# Altium PCB PCB1.PcbDoc (part 1 of 2)
Units mm, origin at the board's own origin, x right, y up, seen from the top; angles counter-clockwise.
Board outline 42.2 x 61.7 mm, 4 copper layers (Top Layer, Mid Layer 1, Mid Layer 2, Bottom Layer), stack 1.586 mm thick; 117 components, 70 nets, 392 pads, 1231 vias.
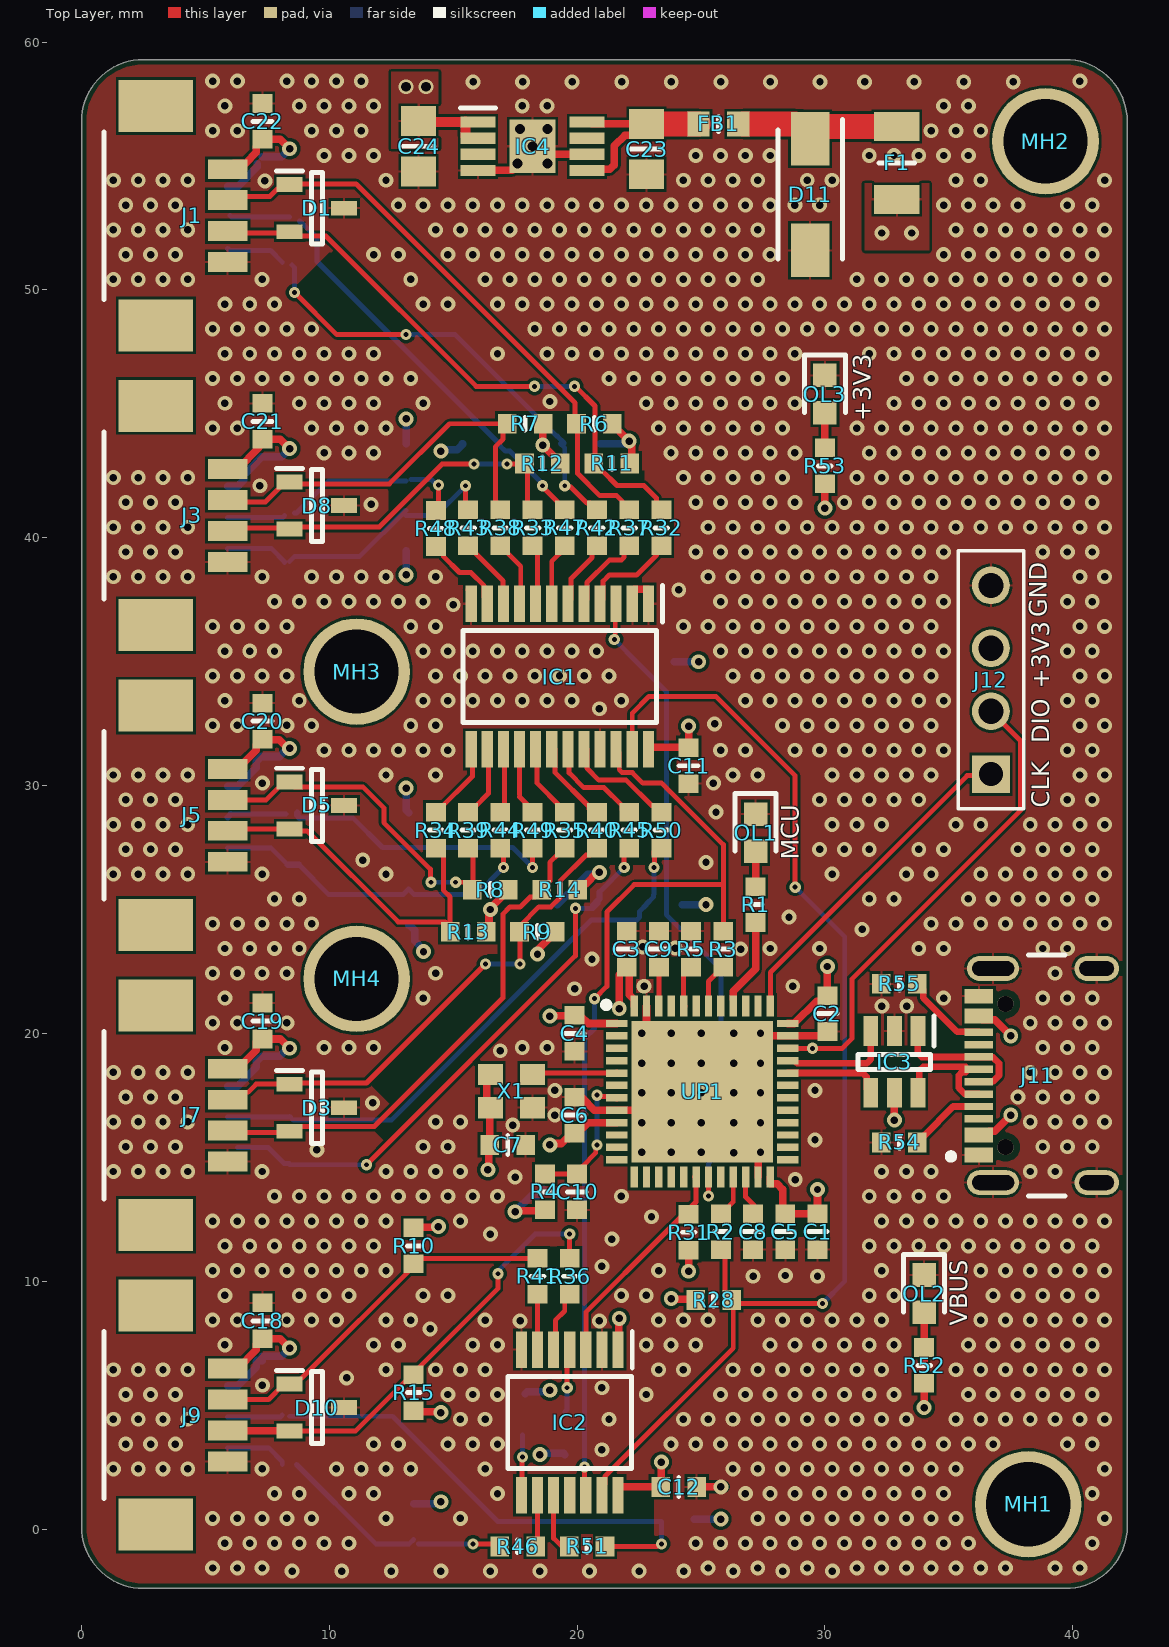
[diagram p0: Top Layer view]
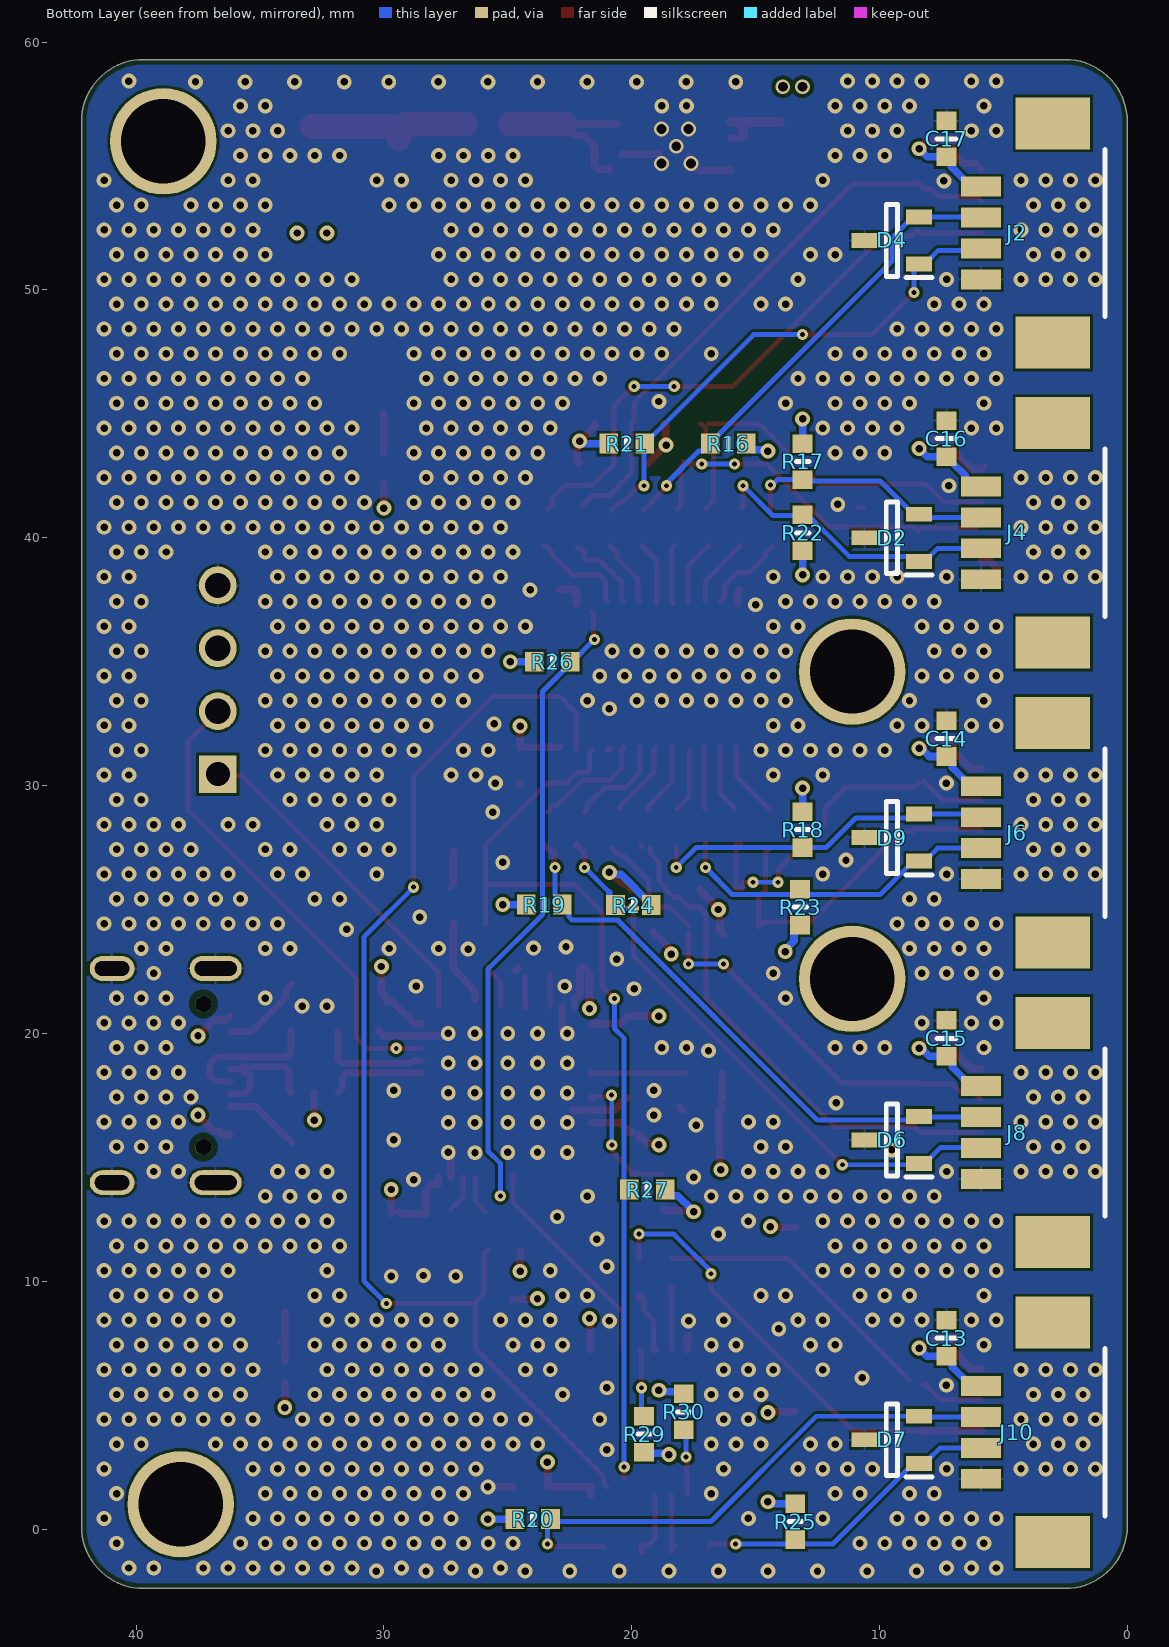
[diagram p1: Bottom Layer view, seen from below]
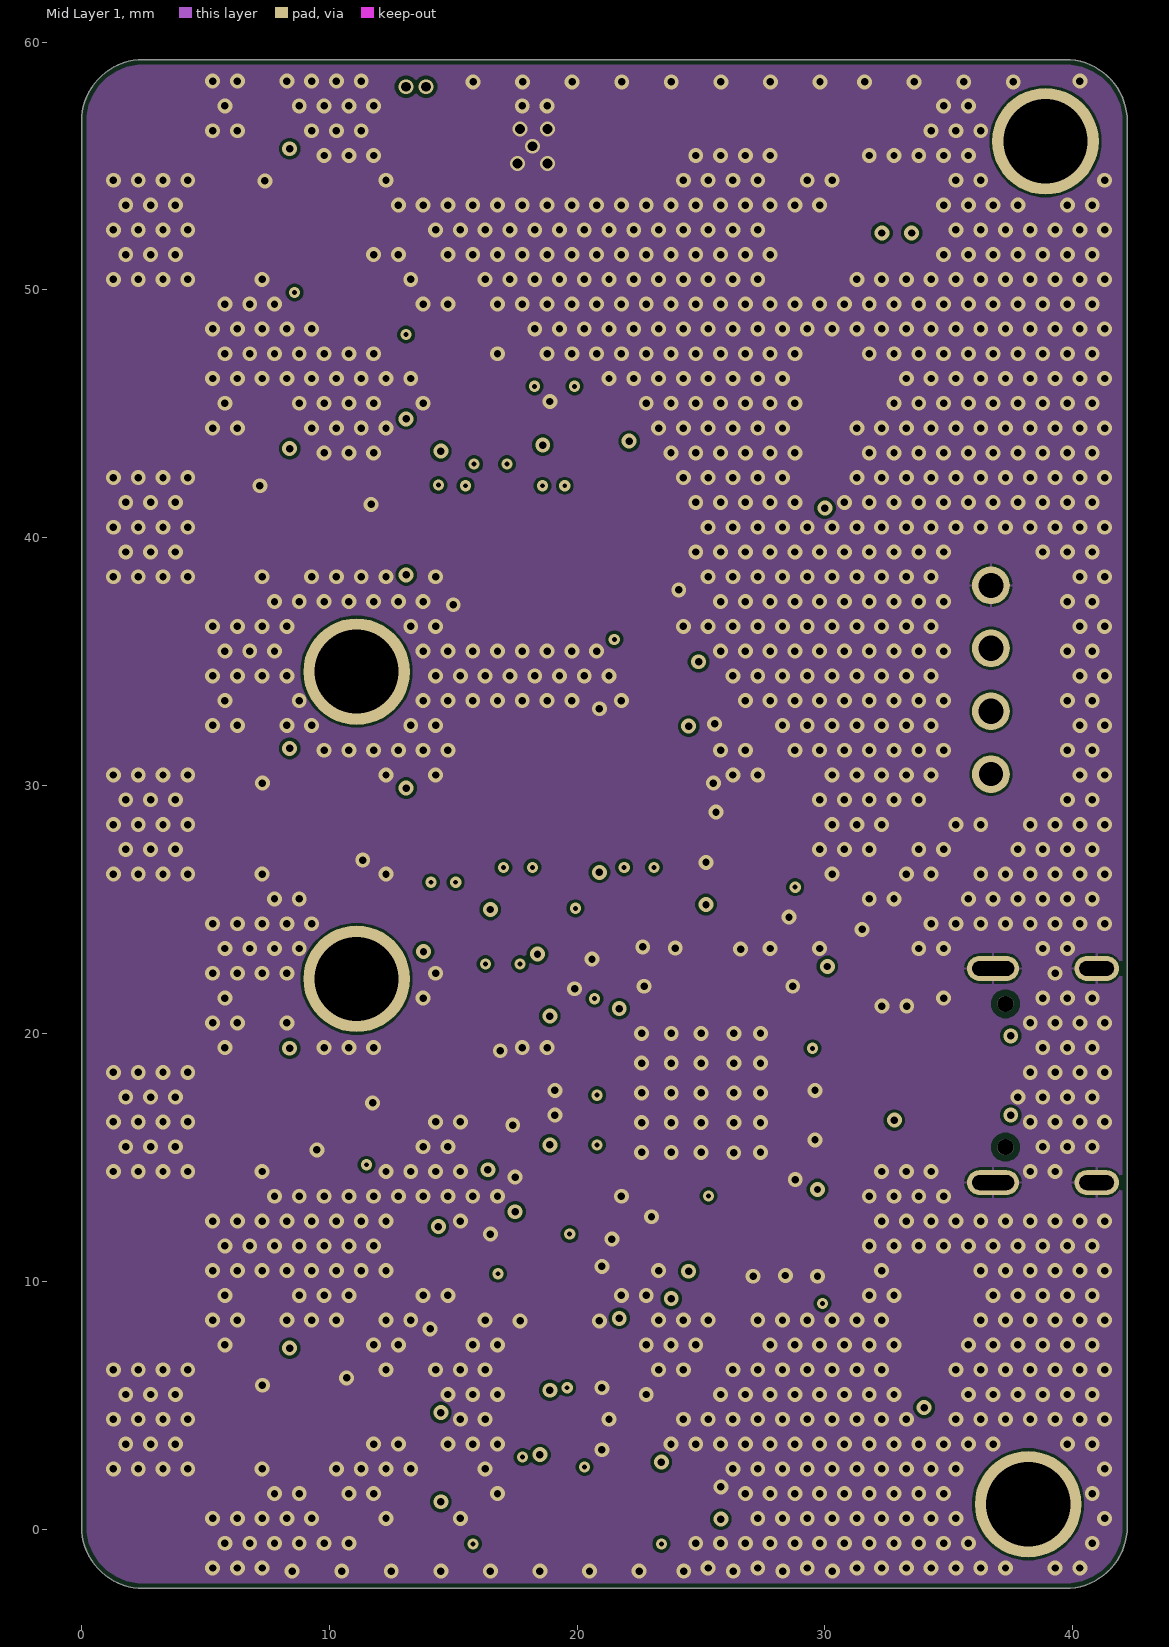
[diagram p2: Mid Layer 1]
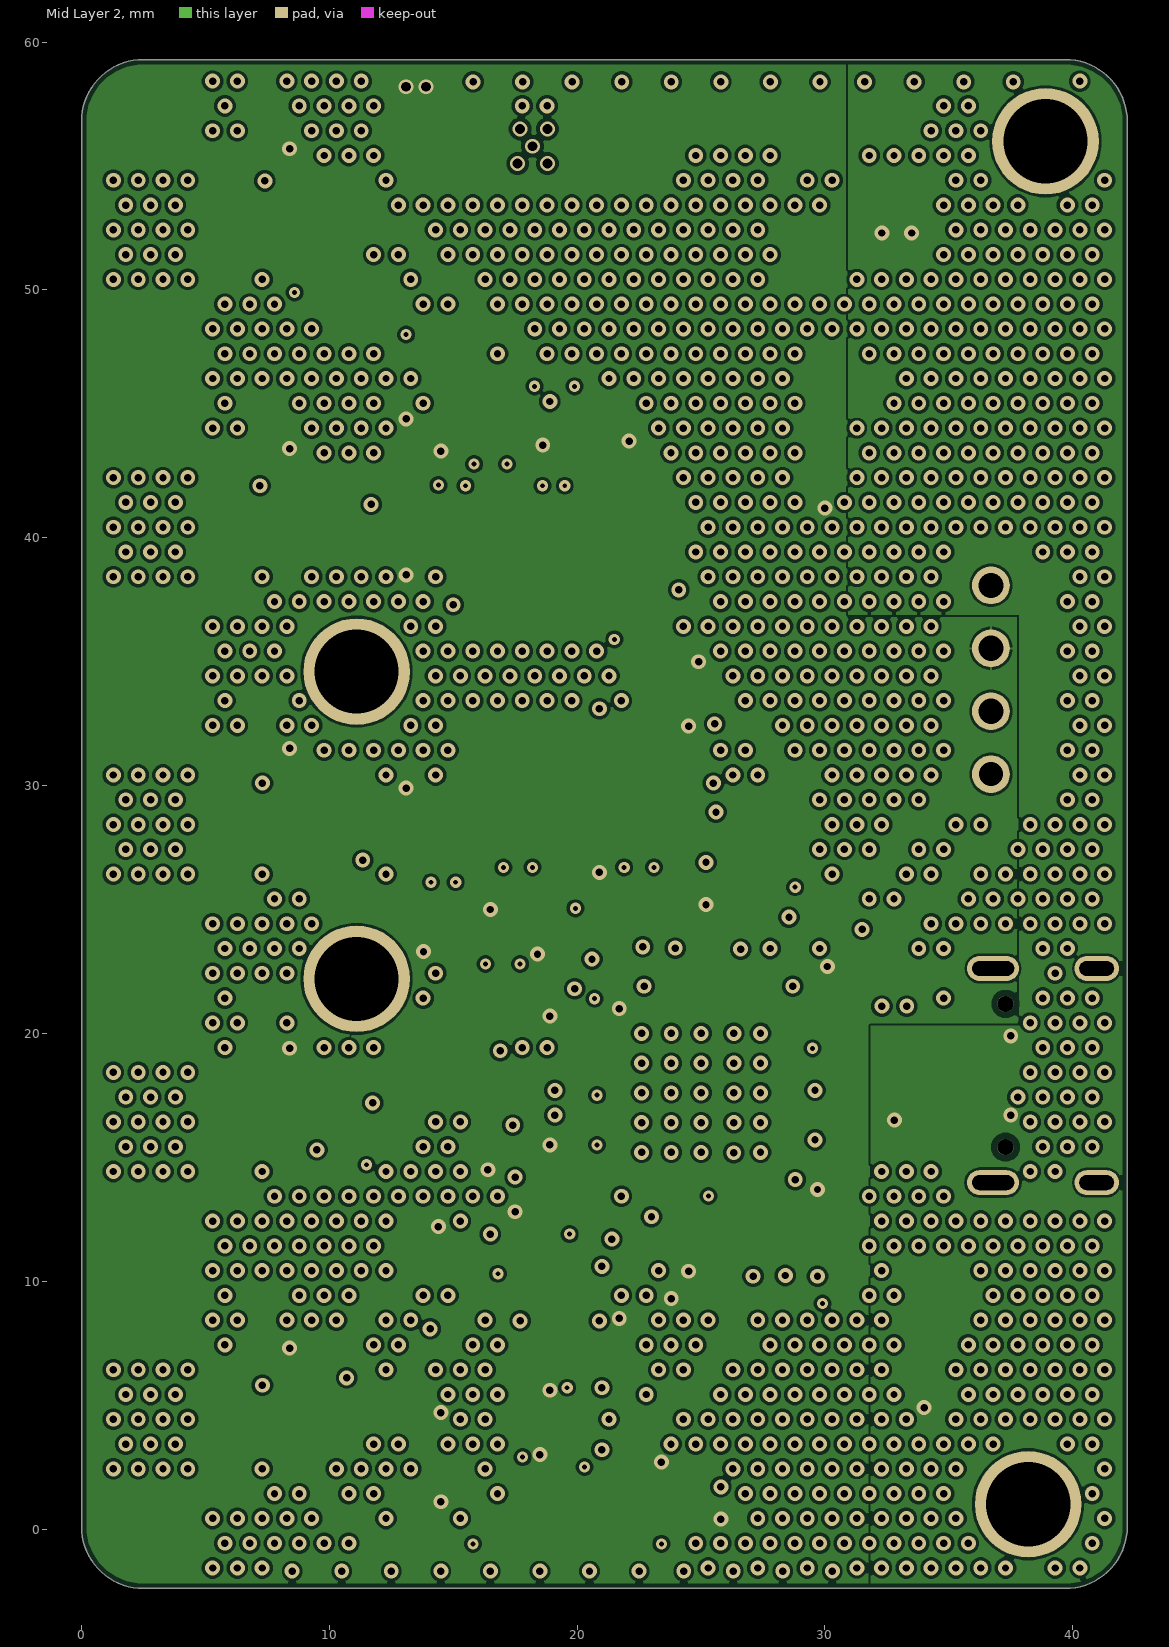
[diagram p3: Mid Layer 2]
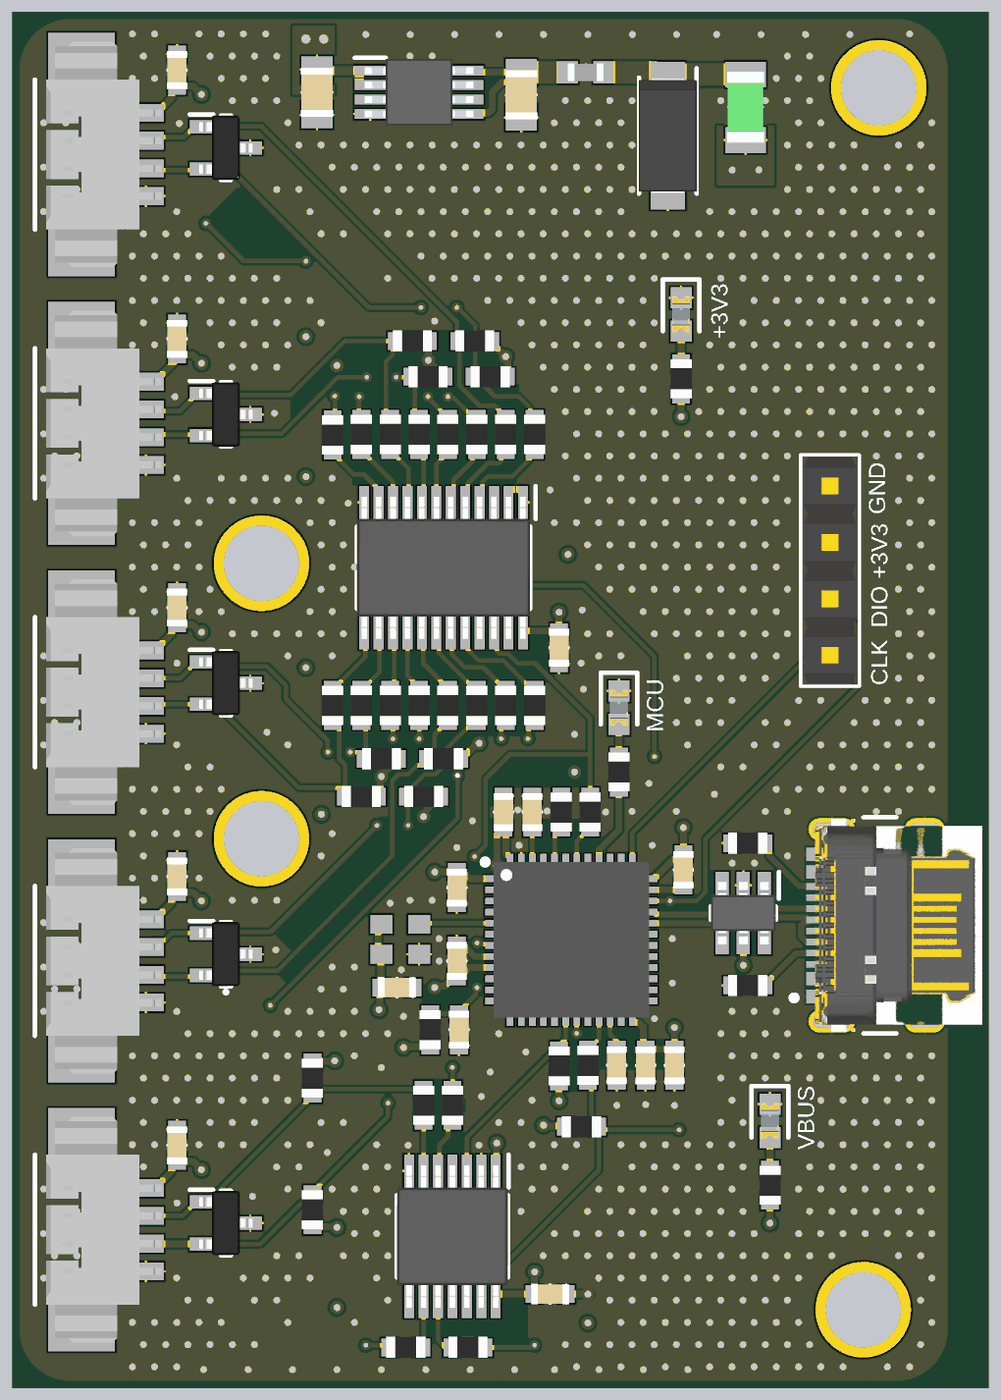
[diagram p5: 3D render of the assembled board from above, using the file's embedded part models]
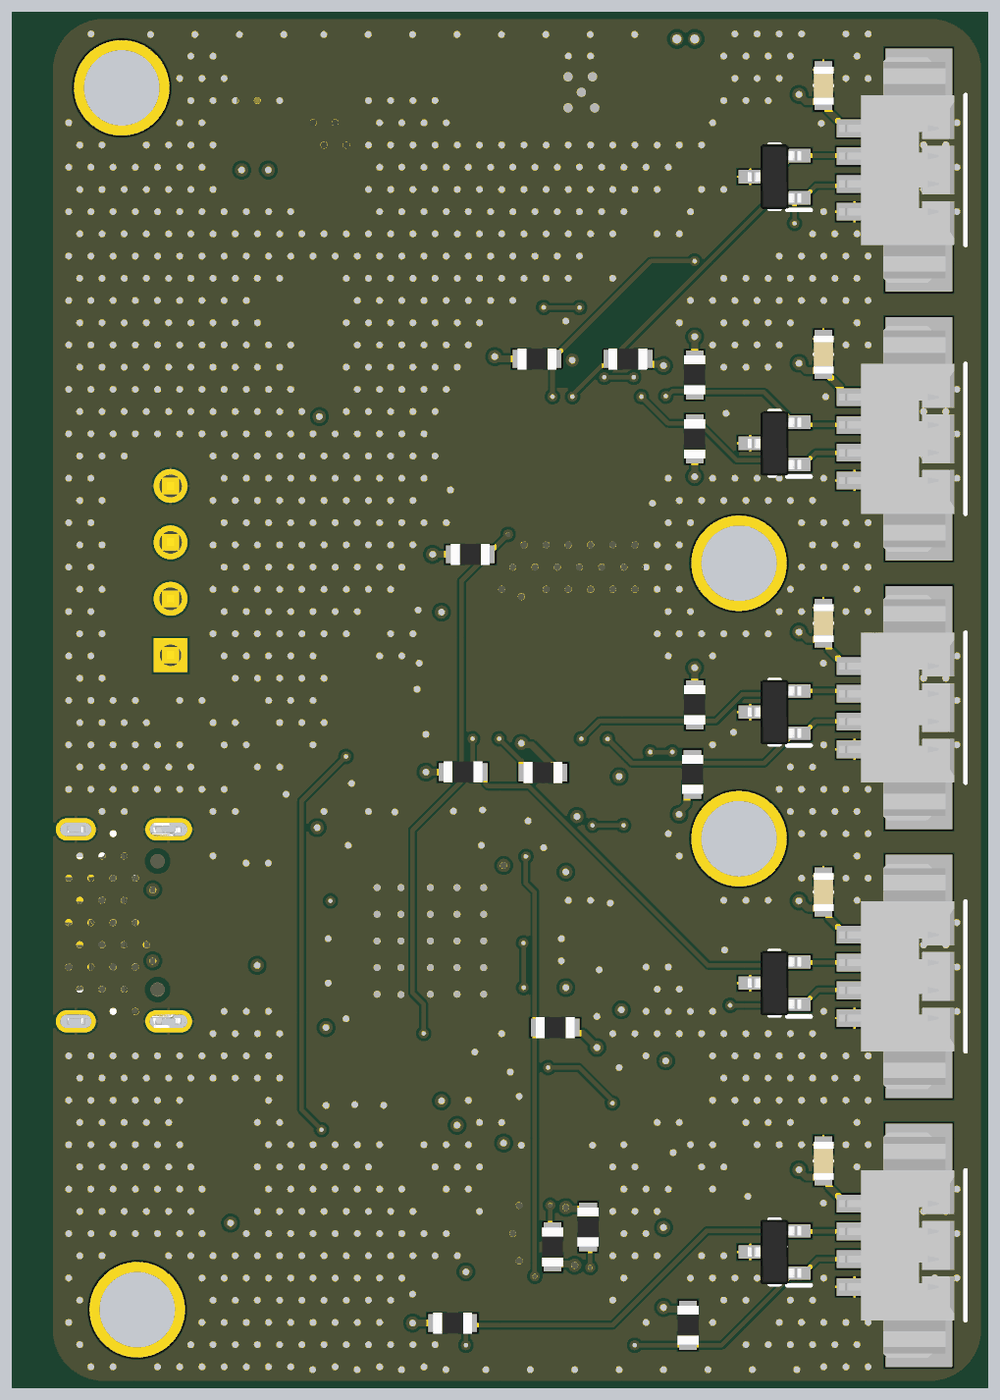
[diagram p6: 3D render of the assembled board from below, using the file's embedded part models]

## Layer stack, top to bottom
Top Solder: solder mask 0.0254, SM-001, Dk 4
Top Layer: signal copper 0.035
Dielectric 1: prepreg 0.2104, PP-017, Dk 4.4
Mid Layer 1: signal copper 0.0152
Dielectric 3: core 1.065, Core-039, Dk 4.6
Mid Layer 2: signal copper 0.0152
Dielectric 5: prepreg 0.2104, PP-017, Dk 4.4
Bottom Layer: signal copper 0.035
Bottom Solder: solder mask 0.0254, SM-001, Dk 4

## Board outline
0,0.1 0,56.8 cw(c2.5,56.8) 2.5,59.3 39.7,59.3 cw(c39.7,56.8) 42.2,56.8 42.2,0.1 cw(c39.7,0.1) 39.7,-2.4 2.5,-2.4 cw(c2.5,0.1)

## Design rules (kind name [scope] priority, off if disabled: settings)
BoardOutlineClearance [All] p1: gap=0.2 ignorepadtopadclearanceinfootprint=FALSE
Clearance [All] p1: gap=0.102 ignorepadtopadclearanceinfootprint=FALSE except(0.127: Arc-Via Track-Via SMDPad-Via THPad-Via Via-Via Via-Fill Via-Poly Via-Region Via-Text; 0.25: Arc-Hole Track-Hole SMDPad-Hole THPad-Hole Via-Hole Fill-Hole Poly-Hole Region-Hole Text-Hole)
ComponentClearance [All] p1: gap=0.102 collisioncheckmode=3 verticalgap=0.102 showdistances=TRUE
DiffPairsRouting [All] p1: maxlimit=0.2 minlimit=0.102 mostfreqgap=0.127 toplayer_minwidth=0.102 toplayer_maxwidth=1816.048 toplayer_prefwidth=0.269 bottomlayer_minwidth=0.102 bottomlayer_maxwidth=1816.048 bottomlayer_prefwidth=0.269 impedanceprofiledriven=TRUE impedanceprofileid={21170277-CD77-4ECB-8BFB-6CDE4E23F43F} impedanceprofilevalue=90.000000 maxuncoupledlength=12.7
Height [All] p1: minheight=0 maxheight=1816.048 prefheight=12.7
HoleSize [All] p1: absolutevalues=TRUE maxlimit=6.3 minlimit=0.2 maxpercent=80.000 minpercent=20.000
HoleToHoleClearance [All] p1: gap=0.25 allowstackedmicrovias=FALSE
MinimumAnnularRing [All] p1: minimumring=0.076
MinimumSolderMaskSliver [All] p1: minsoldermaskwidth=0
PlaneClearance [All] p1: clearance=0.102
PlaneConnect PlaneConnectPowerPads [InPadClass('PowerPads')] p1: planeconnectstyle=Direct reliefexpansion=0.508 reliefentries=4 reliefconductorwidth=0.254 reliefairgap=0.254
PlaneConnect [All] p2: pad.planeconnectstyle=Relief pad.reliefexpansion=0.3 pad.reliefentries=4 pad.reliefconductorwidth=0.102 pad.reliefairgap=0.102 via.planeconnectstyle=Direct via.reliefexpansion=0.3 via.reliefentries=4 via.reliefconductorwidth=0.127 via.reliefairgap=0.127
PolygonConnect PolygonConnectPowerPads [All vs (InPadClass('PowerPads'))] p1: connectstyle=Direct reliefconductorwidth=0.254 reliefentries=4 polygonreliefangle="90 Angle" airgapwidth=0.254
PolygonConnect [All] p2: thpad.connectstyle=Relief thpad.reliefconductorwidth=0.102 thpad.reliefentries=4 thpad.polygonreliefangle="90 Angle" thpad.airgapwidth=0.102 smdpad.connectstyle=Relief smdpad.reliefconductorwidth=0.102 smdpad.reliefentries=4 smdpad.polygonreliefangle="90 Angle" smdpad.airgapwidth=0.102 via.connectstyle=Direct via.reliefconductorwidth=0.127 via.reliefentries=4 via.polygonreliefangle="90 Angle" via.airgapwidth=0.127
RoutingVias [All] p1: holewidth=0.2 width=0.45 viastyle="Through Hole" minholewidth=0.2 minwidth=0.45 maxholewidth=6.3 maxwidth=6.55
SilkToSilkClearance [All] p1: silktosilkclearance=0
SilkToSolderMaskClearance [IsPad] p1: minsilkscreentomaskgap=0.102 clearancetoexposedcopper=TRUE
SolderMaskExpansion [All] p1: expansion=0.075 istentingtop=FALSE
SupplyNets "Schematic Supply Nets_3" [InNet('+3V3')] p1: voltage=0.000
SupplyNets "Schematic Supply Nets_2" [InNet('+V_SAFE')] p2: voltage=0.000
SupplyNets "Schematic Supply Nets_1" [InNet('+VBUS')] p3: voltage=0.000
SupplyNets "Schematic Supply Nets" [InNet('GND')] p4: voltage=0.000
Width [All] p1: maxlimit=1816.048 minlimit=0.102 preferedwidth=0.102
20 further rules are at their usual default settings.

## Classes and differential pairs
component class Main: J12 MH1 MH2 MH3 MH4
component class Designator: C11 C12 D1 D2 D3 D4 D5 D6 D7 D8 D9 D10 IC1 IC2 R6 R7 R8 R9 R10 R11 R12 R13 R14 R15 R16 R17 R18 R19 R20 R21 R22 R23 R24 R25 R26 R27 R28 R29 R30 R31 R32 R33 R34 R35 R36 R37 R38 R39 R40 R41 R42 R43 R44 R45 R46 R47 R48 R49 R50 R51
differential pair USB: +USB_P -USB_N
differential pair MCU_USB: +MCU_USB_P -MCU_USB_N

## Components (designator, comment, footprint, x,y, rotation, side; value= is the part's Value field where it differs from the comment)
C1 "C_4.7u_25V_0603_5" 0603_Capacitor 29.7,12 r270 top value=4.7µF
C2 "C_100n_50V_0603_5" 0603_Capacitor 30.1,20.8 r270 top value=100nF
C3 "C_100n_50V_0603_5" 0603_Capacitor 22,23.4 r90 top value=100nF
C4 "C_100n_50V_0603_5" 0603_Capacitor 19.9,20 r270 top value=100nF
C5 "C_100n_50V_0603_5" 0603_Capacitor 28.4,12 r270 top value=100nF
C6 "C_100n_50V_0603_5" 0603_Capacitor 19.9,16.7 r90 top value=100nF
C7 "C_100n_50V_0603_5" 0603_Capacitor 17.2,15.5 r0 top value=100nF
C8 "C_2.2u_25V_0603_5" 0603_Capacitor 27.1,12 r270 top value=2.2µF
C9 "C_2.2u_25V_0603_5" 0603_Capacitor 23.3,23.4 r90 top value=2.2µF
C10 "C_100n_50V_0603_5" 0603_Capacitor 20,13.6 r270 top value=100nF
C11 "C_100n_50V_0603_5" 0603_Capacitor 24.5,30.8 r270 top value=100nF
C12 "C_100n_50V_0603_5" 0603_Capacitor 24.1,1.7 r0 top value=100nF
C13 "C_100n_50V_0603_5" 0603_Capacitor 7.3,7.7 r90 bottom value=100nF
C14 "C_100n_50V_0603_5" 0603_Capacitor 7.3,31.9 r90 bottom value=100nF
C15 "C_100n_50V_0603_5" 0603_Capacitor 7.3,19.8 r90 bottom value=100nF
C16 "C_100n_50V_0603_5" 0603_Capacitor 7.3,44 r90 bottom value=100nF
C17 "C_100n_50V_0603_5" 0603_Capacitor 7.3,56.1 r90 bottom value=100nF
C18 "C_100n_50V_0603_5" 0603_Capacitor 7.3,8.4 r90 top value=100nF
C19 "C_100n_50V_0603_5" 0603_Capacitor 7.3,20.5 r90 top value=100nF
C20 "C_100n_50V_0603_5" 0603_Capacitor 7.3,32.6 r90 top value=100nF
C21 "C_100n_50V_0603_5" 0603_Capacitor 7.3,44.7 r90 top value=100nF
C22 "C_100n_50V_0603_5" 0603_Capacitor 7.3,56.8 r90 top value=100nF
C23 "C_10u_50V_0805_10" 0805_Capacitor 22.8,55.684 r270 top value=10µF
C24 "C_10u_50V_0805_10" 0805_Capacitor 13.6,55.8 r270 top value=10µF
D1 "PESD5V0L2BT,215" SOT95P230X110-3N 9.5,53.3 r0 top
D2 "PESD5V0L2BT,215" SOT95P230X110-3N 9.5,40 r0 bottom
D3 "PESD5V0L2BT,215" SOT95P230X110-3N 9.5,17 r0 top
D4 "PESD5V0L2BT,215" SOT95P230X110-3N 9.5,52 r0 bottom
D5 "PESD5V0L2BT,215" SOT95P230X110-3N 9.5,29.2 r0 top
D6 "PESD5V0L2BT,215" SOT95P230X110-3N 9.5,15.7 r0 bottom
D7 "PESD5V0L2BT,215" SOT95P230X110-3N 9.5,3.6 r0 bottom
D8 "PESD5V0L2BT,215" SOT95P230X110-3N 9.5,41.3 r0 top
D9 "PESD5V0L2BT,215" SOT95P230X110-3N 9.5,27.9 r0 bottom
D10 "PESD5V0L2BT,215" SOT95P230X110-3N 9.5,4.9 r0 top
D11 "SMAJ5.0A" DIOM5226X243N 29.4,53.85 r270 top
F1 "1206L050_15YR" FUSC3216X75N 32.9,55.125 r90 top
FB1 "MPZ1608S601ATA00" BEADC1608X75N 25.7,56.7 r180 top
IC1 "TCA9548APW" SOP65P640X120-24N 19.3,34.4 r270 top
IC2 "TCA9543APW" SOP65P640X120-14N 19.7,4.3 r270 top
IC3 "USBLC6-2SC6" SOT95P280X145-6N 32.8,18.85 r270 top
IC4 "TLV76733DGNR" SOP65P490X110-9N 18.2,55.8 r0 top
J1 "53261-0471" 53261-0471 5.1,53 r270 top
J2 "53261-0471" 53261-0471 5.1,52.3 r90 bottom
J3 "53261-0471" 53261-0471 5.1,40.9 r270 top
J4 "53261-0471" 53261-0471 5.1,40.2 r90 bottom
J5 "53261-0471" 53261-0471 5.1,28.8 r270 top
J6 "53261-0471" 53261-0471 5.1,28.1 r90 bottom
J7 "53261-0471" 53261-0471 5.1,16.7 r270 top
J8 "53261-0471" 53261-0471 5.1,16 r90 bottom
J9 "53261-0471" 53261-0471 5.1,4.6 r270 top
J10 "53261-0471" 53261-0471 5.1,3.9 r90 bottom
J11 "USB4105-GF-A" USB_C 39.8,18.3 r90 top
J12 "77311-818-04LF" 77311-818-04LF_AMP 36.7,30.46 r270 top
MH1 "MH_M3" M3#1 38.2,1 r0 top
MH2 "MH_M3" M3#2 38,56 r0 top
MH3 "MH_M3" M3#1 11.1,34.6 r0 top
MH4 "MH_M3" M3#1 11.1,22.2 r0 top
OL1 "SML-LX0603SYW-TR" LEDC1608X60N 27.2,28.1 r270 top
OL2 "SML-LX0603SIW-TR" LEDC1608X60N 34,9.5 r270 top
OL3 "SML-LX0603GW-TR" LEDC1608X60N 30,45.8 r270 top
R1 "R_1k_0603_1" 0603_Resistor 27.2,25.2 r270 top
R2 "R_0_0603_5" 0603_Resistor 25.8,12 r90 top
R3 "R_0_0603_5" 0603_Resistor 25.9,23.4 r270 top
R4 "R_1k_0603_1" 0603_Resistor 18.7,13.6 r270 top
R5 "R_10k_0603_5" 0603_Resistor 24.6,23.4 r270 top
R6 "R_2.2k_0603_5" 0603_Resistor 20.7,44.6 r180 top
R7 "R_2.2k_0603_5" 0603_Resistor 17.9,44.6 r180 top
R8 "R_2.2k_0603_5" 0603_Resistor 16.5,25.8 r180 top
R9 "R_2.2k_0603_5" 0603_Resistor 18.4,24.1 r180 top
R10 "R_2.2k_0603_5" 0603_Resistor 13.4,11.425 r270 top
R11 "R_2.2k_0603_5" 0603_Resistor 21.4,43 r180 top
R12 "R_2.2k_0603_5" 0603_Resistor 18.6,43 r180 top
R13 "R_2.2k_0603_5" 0603_Resistor 15.6,24.1 r180 top
R14 "R_2.2k_0603_5" 0603_Resistor 19.3,25.8 r180 top
R15 "R_2.2k_0603_5" 0603_Resistor 13.4,5.5 r90 top
R16 "R_2.2k_0603_5" 0603_Resistor 16.1,43.8 r0 bottom
R17 "R_2.2k_0603_5" 0603_Resistor 13.1,43.075 r270 bottom
R18 "R_2.2k_0603_5" 0603_Resistor 13.1,28.225 r270 bottom
R19 "R_2.2k_0603_5" 0603_Resistor 23.525,25.2 r180 bottom
R20 "R_2.2k_0603_5" 0603_Resistor 24,0.4 r180 bottom
R21 "R_2.2k_0603_5" 0603_Resistor 20.2,43.8 r180 bottom
R22 "R_2.2k_0603_5" 0603_Resistor 13.1,40.2 r90 bottom
R23 "R_2.2k_0603_5" 0603_Resistor 13.2,25.1 r90 bottom
R24 "R_2.2k_0603_5" 0603_Resistor 19.927,25.175 r0 bottom
R25 "R_2.2k_0603_5" 0603_Resistor 13.4,0.3 r270 bottom
R26 "R_10k_0603_5" 0603_Resistor 23.2,35 r180 bottom
R27 "R_2.2k_0603_5" 0603_Resistor 19.375,13.7 r0 bottom
R28 "R_2.2k_0603_5" 0603_Resistor 25.51,9.241 r0 top
R29 "R_10k_0603_5" 0603_Resistor 19.5,3.825 r90 bottom
R30 "R_10k_0603_5" 0603_Resistor 17.9,4.725 r270 bottom
R31 "R_10k_0603_5" 0603_Resistor 24.5,11.975 r90 top
R32 "R_0_0603_5" 0603_Resistor 23.4,40.4 r90 top
R33 "R_0_0603_5" 0603_Resistor 18.2,40.4 r90 top
R34 "R_0_0603_5" 0603_Resistor 14.3,28.2 r270 top
R35 "R_0_0603_5" 0603_Resistor 19.5,28.2 r270 top
R36 "R_0_0603_5" 0603_Resistor 19.7,10.2 r90 top
R37 "R_0_0603_5" 0603_Resistor 22.1,40.4 r90 top
R38 "R_0_0603_5" 0603_Resistor 16.9,40.4 r90 top
R39 "R_0_0603_5" 0603_Resistor 15.6,28.2 r270 top
R40 "R_0_0603_5" 0603_Resistor 20.8,28.2 r270 top
R41 "R_0_0603_5" 0603_Resistor 18.4,10.2 r90 top
R42 "R_0_0603_5" 0603_Resistor 20.8,40.4 r90 top
R43 "R_0_0603_5" 0603_Resistor 15.6,40.4 r90 top
R44 "R_0_0603_5" 0603_Resistor 16.9,28.2 r270 top
R45 "R_0_0603_5" 0603_Resistor 22.1,28.2 r270 top
R46 "R_0_0603_5" 0603_Resistor 17.6,-0.7 r180 top
R47 "R_0_0603_5" 0603_Resistor 19.5,40.4 r90 top
R48 "R_0_0603_5" 0603_Resistor 14.3,40.375 r90 top
R49 "R_0_0603_5" 0603_Resistor 18.2,28.2 r270 top
R50 "R_0_0603_5" 0603_Resistor 23.4,28.2 r270 top
R51 "R_0_0603_5" 0603_Resistor 20.4,-0.7 r0 top
R52 "R_1k_0603_1" 0603_Resistor 34,6.6 r270 top
R53 "R_1k_0603_1" 0603_Resistor 30,42.9 r270 top
R54 "R_5k1_0603_5" 0603_Resistor 33,15.6 r180 top
R55 "R_5k1_0603_5" 0603_Resistor 33,22 r180 top
UP1 "UP_STM32H503CBU6" UFQFPN48 25.05,17.65 r0 top
X1 "X_16MHz_LFSPXO066657CUTT" X_2mm_2.5mm_oscillator 17.35,17.675 r180 top

## Footprints (in the part's own frame and the unit in brackets; to place one, negate y for a bottom-side part, rotate by r counter-clockwise, add the part's x,y. Pads: shape width x height; smd on the part's side, far side on the other; paste and mask are expansions set on the pad)
0603_Capacitor [mm] "Default; Revision #1 / Original footprint"
  rect 0.75x0.8 smd: 1(-0.725,0) 2(0.725,0)
  silkscreen extent 0,-0.38 0,0.38, body extent -0.85,-0.45 0.85,0.45, height 0.89
0603_Resistor [mm] "Default; Revision #1"
  rect 0.75x0.8 smd: 1(-0.725,0) 2(0.725,0)
  silkscreen extent 0,-0.25 0,0.25, body extent -0.87,-0.47 0.88,0.48, height 0.54
0805_Capacitor [mil] "Default; Revision #1"
  rect 47.24x55 smd: 1(-40,0) 2(40,0)
  silkscreen extent 0,-25 0,25, body extent -43,-29 43,29, height 53
53261-0471 [mm]
  rect 0.8x1.6 smd: 1(-1.875,0.8) 2(-0.625,0.8) 3(0.625,0.8) 4(1.875,0.8)
  rect 2.1x3 smd: 5(4.425,-2.1) 6(-4.425,-2.1)
  silkscreen extent -3.37,-4.2 3.37,-4.2, body extent -5.07,-3.69 5.07,1.51, height 3.4
77311-818-04LF_AMP [mil]
  rect 60x60 / inner round 60 / far side rect 60x60 hole 38 paste-99999 mask+0: 1(0,0)
  round 60 hole 40 paste-99999 mask+0: 2(-100,0) 3(-200,0) 4(-300,0)
  silkscreen extent -355,-52 55,52, body extent -350,-47 50,47, height 350
BEADC1608X75N [mm]
  rect 0.9x1 smd: 1(-0.8,0) 2(0.8,0)
  silkscreen extent 0,-0.3 0,0.3, body extent -0.8,-0.4 0.8,0.4, height 0.75
DIOM5226X243N [mm]
  rect 2.15x1.55 smd: 1(-2.25,0) 2(2.25,0)
  silkscreen extent -3.03,-1.3 2.61,1.3, body extent -2.61,-1.3 2.61,1.3, height 2.43
FUSC3216X75N [mm]
  rect 1.16x1.82 smd: 1(-1.475,0) 2(1.475,0)
  silkscreen extent 0,-0.72 0,0.72, body extent -1.6,-0.82 1.6,0.82, height 0.75
LEDC1608X60N [mm]
  rect 0.95x0.95 smd: 1(-0.75,0) 2(0.75,0)
  silkscreen extent -1.58,-0.82 0.75,0.82, body extent -0.8,-0.4 0.8,0.4, height 0.63
M3#1 [mm] "Default; Revision #1"
  round 4.3 hole 3.4: 1(0,0)
M3#2 [mm] "Default; Revision #1"
  round 4.3 hole 3.4: 1(0.9,0)
SOP65P490X110-9N [mm]
  rect 1.4x0.45 smd: 1(-2.2,0.975) 2(-2.2,0.325) 3(-2.2,-0.325) 4(-2.2,-0.975) 5(2.2,-0.975) 6(2.2,-0.325) 7(2.2,0.325) 8(2.2,0.975)
  rect 1.846x2.15 smd: 9(0,0)
  silkscreen extent -2.9,1.55 -1.5,1.55, body extent -2.45,-1.5 2.45,1.5, height 1.1
SOP65P640X120-14N [mm]
  rect 1.475x0.45 smd: 1(-2.938,1.95) 2(-2.938,1.3) 3(-2.938,0.65) 4(-2.938,0) 5(-2.938,-0.65) 6(-2.938,-1.3) 7(-2.938,-1.95) 8(2.938,-1.95) 9(2.938,-1.3) 10(2.938,-0.65) 11(2.938,0) 12(2.938,0.65) 13(2.938,1.3) 14(2.938,1.95)
  silkscreen extent -3.67,-2.5 1.85,2.52, body extent -3.2,-2.5 3.2,2.5, height 1.13
SOP65P640X120-24N [mm]
  rect 1.475x0.45 smd: 1(-2.938,3.575) 2(-2.938,2.925) 3(-2.938,2.275) 4(-2.938,1.625) 5(-2.938,0.975) 6(-2.938,0.325) 7(-2.938,-0.325) 8(-2.938,-0.975) 9(-2.938,-1.625) 10(-2.938,-2.275) 11(-2.938,-2.925) 12(-2.938,-3.575) 13(2.938,-3.575) 14(2.938,-2.925) 15(2.938,-2.275) 16(2.938,-1.625) 17(2.938,-0.975) 18(2.938,-0.325) 19(2.938,0.325) 20(2.938,0.975) 21(2.938,1.625) 22(2.938,2.275) 23(2.938,2.925) 24(2.938,3.575)
  silkscreen extent -3.67,-3.9 1.85,4.15, body extent -3.2,-3.9 3.2,3.9, height 1.13
SOT95P230X110-3N [mm]
  rect 1.05x0.6 smd: 1(-1.1,0.95) 2(-1.1,-0.95) 3(1.1,0)
  silkscreen extent -1.63,-1.45 0.23,1.5, body extent -1.2,-1.45 1.2,1.45, height 0.95
SOT95P280X145-6N [mm]
  rect 1.2x0.6 smd: 1(-1.25,0.95) 2(-1.25,0) 3(-1.25,-0.95) 4(1.25,-0.95) 5(1.25,0) 6(1.25,0.95)
  silkscreen extent -1.85,-1.46 0.3,1.6, body extent -1.4,-1.46 1.4,1.46, height 1.45
UFQFPN48 [mm] "Default; Revision #1"
  rect 0.85x0.3 smd: 1(-3.45,2.75) 2(-3.45,2.25) 3(-3.45,1.75) 4(-3.45,1.25) 5(-3.45,0.75) 6(-3.45,0.25) 7(-3.45,-0.25) 8(-3.45,-0.75) 9(-3.45,-1.25) 10(-3.45,-1.75) 11(-3.45,-2.25) 12(-3.45,-2.75) 25(3.45,-2.75) 26(3.45,-2.25) 27(3.45,-1.75) 28(3.45,-1.25) 29(3.45,-0.75) 30(3.45,-0.25) 31(3.45,0.25) 32(3.45,0.75) 33(3.45,1.25) 34(3.45,1.75) 35(3.45,2.25) 36(3.45,2.75)
  rect 0.3x0.85 smd: 13(-2.75,-3.45) 14(-2.25,-3.45) 15(-1.75,-3.45) 16(-1.25,-3.45) 17(-0.75,-3.45) 18(-0.25,-3.45) 19(0.25,-3.45) 20(0.75,-3.45) 21(1.25,-3.45) 22(1.75,-3.45) 23(2.25,-3.45) 24(2.75,-3.45) 37(2.75,3.45) 38(2.25,3.45) 39(1.75,3.45) 40(1.25,3.45) 41(0.75,3.45) 42(0.25,3.45) 43(-0.25,3.45) 44(-0.75,3.45) 45(-1.25,3.45) 46(-1.75,3.45) 47(-2.25,3.45) 48(-2.75,3.45)
  rect 5.7x5.7 smd: 49(0,0)
  silkscreen extent -4,3.38 -3.75,3.62, body extent -3.5,-3.5 3.5,3.5, height 0.6
USB_C [mm]
  rrect100% 1x2.1 hole 1.7 slot 0.6 at 0 deg paste-2539.97 mask+0: 1(-4.32,3.015) 2(4.32,3.015)
  rrect100% 1x1.8 hole 1.4 slot 0.6 at 0 deg paste-2539.97 mask+0: 3(-4.32,-1.165) 4(4.32,-1.165)
  rect 0.6x1.15 smd paste+0 mask+0: A1-B12(-3.2,3.59) A4-B9(-2.4,3.59) B1-A12(3.2,3.59) B4-A9(2.4,3.59)
  rect 0.3x1.15 smd paste+0 mask+0: A5(-1.25,3.59) A6(-0.25,3.59) A7(0.25,3.59) A8(1.25,3.59) B5(1.75,3.59) B6(0.75,3.59) B7(-0.75,3.59) B8(-1.75,3.59)
  round 0.65 hole 0.65 unplated paste-2539.97 mask+0: ""(-2.89,2.515) ""(2.89,2.515)
  silkscreen extent -4.86,0.11 4.86,4.84, body extent -4.96,-3.94 4.96,4.27, height 0.25
X_2mm_2.5mm_oscillator [mm] "Default; Revision #1"
  rect 1x0.85 smd: 1(0.85,0.675) 2(-0.85,0.675) 3(-0.85,-0.675) 4(0.85,-0.675)
  body extent -1.25,-1 1.25,1, height 0.83

## Part data
C1: library part CMP-001-00011-26, Capacitor Type=Ceramic, Case/Package=0603, Tolerance=5%, Voltage Rating=25V, HelpURL=https://eu.mouser.com/datasheet/2/40/cx5r_KGM-3223198.pdf, Mounting Technology=SMT, Revision Num.=1
C2 C3 C4 C5 C6 C7 C10 C11 C12 C13 C14 C15 C16 C17 C18 C19 C20 C21 C22: library part CMP-001-00008-27, Capacitor Type=Ceramic, Case/Package=0603, Tolerance=5%, Voltage Rating=50V, HelpURL=https://www.tme.eu/Document/78f46414e6dac38b7cca12338ea208b0/X7RDielectric.pdf, Mounting Technology=SMT, Revision Num.=1
C8 C9: library part CMP-001-00022-24, Capacitor Type=Ceramic, Case/Package=0603, Tolerance=5%, Voltage Rating=25V, HelpURL=https://eu.mouser.com/datasheet/2/281/1/GRT188C71E225KE13_01A-3158366.pdf, Mounting Technology=SMT, Revision Num.=1
C23 C24: library part CMP-001-00003-17, Capacitor Type=Ceramic, Case/Package=0805, Man. Part Num.=GRM21BR61H106KE43L, Tolerance=5%, Voltage Rating=50V, HelpURL=https://www.mouser.pl/datasheet/2/281/1/GRM21BR61H106KE43_01A-1986884.pdf, Mounting Technology=SMT, Revision Num.=1
D1 D2 D3 D4 D5 D6 D7 D8 D9 D10: "Diode ESD (Bi-directional)", Manufacturer_Name=Nexperia, Mouser Part Number=771-PESD5V0L2BT-T/R, Arrow Part Number=PESD5V0L2BT,215, Arrow Price/Stock=https://www.arrow.com/en/products/pesd5v0l2bt215/nexperia?utm_currency=USD&region=nac, Datasheet Link=https://assets.nexperia.com/documents/data-sheet/PESDXL2BT_SER.pdf, Height=1.1mm, Manufacturer_Part_Number=PESD5V0L2BT,215, Mouser Price/Stock=https://www.mouser.co.uk/ProductDetail/Nexperia/PESD5V0L2BT215?qs=LOCUfHb8d9sw%252B%2FcZzpNtzw%3D%3D
D11: "TVS Diode (Uni-directional)", Manufacturer_Name="Kyocera AVX", Mouser Part Number=581-SMAJ5.0A, Arrow Part Number=SMAJ5.0A, Arrow Price/Stock=null?region=nac, Datasheet Link=http://datasheets.kyocera-avx.com/tvsdiodes.pdf, Height=2.43mm, Manufacturer_Part_Number=SMAJ5.0A, Mouser Price/Stock=https://www.mouser.co.uk/ProductDetail/KYOCERA-AVX/SMAJ5.0A?qs=tuYJFV7zqWuCnk6fJgfdVg%3D%3D
F1: "Fuse", Manufacturer_Name=Wickmann, Manufacturer_Part_Number=1206L050/15YR, Datasheet Link=https://docs.rs-online.com/8c7c/0900766b81637964.pdf, Height=0.75mm
FB1: "Ferrite Bead", Manufacturer_Name=TDK, Mouser Part Number=810-MPZ1608S601ATA00, Arrow Part Number=MPZ1608S601ATA00, Arrow Price/Stock=https://www.arrow.com/en/products/mpz1608s601ata00/tdk.html?utm_currency=USD&region=europe, Datasheet Link=https://product.tdk.com/system/files/dam/doc/product/emc/emc/beads/catalog/beads_commercial_power_mpz1608_en.pdf, Height=0.75mm, Manufacturer_Part_Number=MPZ1608S601ATA00, Mouser Price/Stock=https://www.mouser.co.uk/ProductDetail/TDK/MPZ1608S601ATA00?qs=47dIwT2ZIzth0CTKDYh9rw%3D%3D
IC1 IC2: "Integrated Circuit", Manufacturer_Name="Texas Instruments", Height=1.2mm
  IC1: Datasheet Link=http://www.ti.com/lit/ds/symlink/tca9548a.pdf, Manufacturer_Part_Number=TCA9548APW
  IC2: Datasheet Link=https://www.ti.com/lit/ds/symlink/tca9543a.pdf?ts=1706191605881&ref_url=https%253A%252F%252Fwww.ti.com%252Fproduct%252FTCA9543A%252Fpart-details%252FTCA9543APWR, Manufacturer_Part_Number=TCA9543APW
IC3: "Integrated Circuit", Manufacturer_Name=STMicroelectronics, Mouser Part Number=511-USBLC6-2SC6, Arrow Part Number=USBLC6-2SC6, Arrow Price/Stock=https://www.arrow.com/en/products/usblc6-2sc6/stmicroelectronics?utm_currency=USD&region=europe, Datasheet Link=https://www.st.com/resource/en/datasheet/usblc6-2.pdf, Height=1.45mm, Manufacturer_Part_Number=USBLC6-2SC6, Mouser Price/Stock=https://www.mouser.co.uk/ProductDetail/STMicroelectronics/USBLC6-2SC6?qs=po45yt2pPpu%2FhNIlwQdTlg%3D%3D
IC4: "Integrated Circuit", Manufacturer_Name="Texas Instruments", Mouser Part Number=595-TLV76733DGNR, Arrow Part Number=TLV76733DGNR, Arrow Price/Stock=https://www.arrow.com/en/products/tlv76733dgnr/texas-instruments?utm_currency=USD&region=nac, Datasheet Link=https://www.ti.com/lit/ds/symlink/tlv767.pdf?ts=1601893180135&ref_url=https%253A%252F%252Fduckduckgo.com%252F, Height=1.1mm, Manufacturer_Part_Number=TLV76733DGNR, Mouser Price/Stock=https://www.mouser.co.uk/ProductDetail/Texas-Instruments/TLV76733DGNR?qs=W%2FMpXkg%252BdQ7WCurh%2FfEdlw%3D%3D
J1 J2 J3 J4 J5 J6 J7 J8 J9 J10: "Connector", Manufacturer_Name=Molex, Mouser Part Number=538-53261-0471, Arrow Part Number=53261-0471, Arrow Price/Stock=null?region=nac, Datasheet Link=http://www.molex.com/webdocs/datasheets/pdf/en-us//0532610471_PCB_HEADERS.pdf, Manufacturer_Part_Number=53261-0471, Mouser Price/Stock=https://www.mouser.co.uk/ProductDetail/Molex/53261-0471?qs=%252B72YyncTwW9e3et3PwnEMw%3D%3D
J11: library part USB_C, "USB Connector Type-C, 16 Contact(s), Female, Right Angle, SMT, USB 2.0"
J12: "Description", Manufacturer_Name="Amphenol ICC", Copyright="Copyright (C) 2025 Ultra Librarian. All rights reserved.", Manufacturer_Part_Number=77311-818-04LF, RefDes=RefDes, Type=Type
MH1 MH2 MH3 MH4: library part CMP-00028-00002-1, "Mounting hole; M3 Screw; 3.4mm x 4.3mm", Man. Part Num.=M3, Diameter=4.3mm, Hole size=3.4mm, Revision Num.=1
OL1: "LED", Manufacturer_Name=Lumex, Mouser Part Number=696-SML-LX0603SYW, Arrow Part Number=SML-LX0603SYW-TR, Arrow Price/Stock=https://www.arrow.com/en/products/sml-lx0603syw-tr/lumex?utm_currency=USD&region=nac, Datasheet Link=https://datasheet.datasheetarchive.com/originals/distributors/Datasheets-AE/DSA3AE0000479.pdf, Height=0.85mm, Manufacturer_Part_Number=SML-LX0603SYW-TR, Mouser Price/Stock=https://www.mouser.co.uk/ProductDetail/Lumex/SML-LX0603SYW-TR?qs=lPH1AmYLb0wIUT30EAX6ng%3D%3D
OL2: "LED", Manufacturer_Name=Lumex, Mouser Part Number=696-SML-LX0603SIW, Arrow Part Number=SML-LX0603SIW-TR, Arrow Price/Stock=https://www.arrow.com/en/products/sml-lx0603siw-tr/lumex?utm_currency=USD&region=nac, Datasheet Link=https://www.lumex.com/led-smd-0603.html, Height=0.6mm, Manufacturer_Part_Number=SML-LX0603SIW-TR, Mouser Price/Stock=https://www.mouser.co.uk/ProductDetail/Lumex/SML-LX0603SIW-TR?qs=lPH1AmYLb0ytkrMTawxMgQ%3D%3D
OL3: "LED", Manufacturer_Name=Lumex, Mouser Part Number=N/A, Arrow Part Number=SML-LX0603GW-TR, Arrow Price/Stock=https://www.arrow.com/en/products/sml-lx0603gw-tr/lumex?utm_currency=USD&region=nac, Datasheet Link=https://www.lumex.com/datasheet/SML-LX0603GW-TR, Height=0.727mm, Manufacturer_Part_Number=SML-LX0603GW-TR, Mouser Price/Stock=https://www.mouser.com/Search/Refine.aspx?Keyword=N%2FA
R1 R4 R52 R53: library part CMP-009-00099-4, Case/Package=0603, POWER=100mW, RESISTANCE=1k, Tolerance=1%, Voltage Rating=75V, HelpURL=https://www.tme.eu/Document/622e28308c06d160637f2b14751ba16b/Data%20Sheet%20CRCW_BCe3.pdf, Mounting Technology=SMT, Revision Num.=1
R2 R3 R32 R33 R34 R35 R36 R37 R38 R39 R40 R41 R42 R43 R44 R45 R46 R47 R48 R49 R50 R51: library part CMP-009-00016-20, Case/Package=0603, POWER=100mW, RESISTANCE=0, Tolerance=5%, Voltage Rating=50V, HelpURL=https://www.tme.eu/Document/c283990e907c122bb808207d1578ac7f/POWER_RATING-DTE.pdf, Mounting Technology=SMT, Revision Num.=1
R5 R26 R29 R30 R31: library part CMP-009-00002-21, Case/Package=0603, POWER=100mW, RESISTANCE=10k, Tolerance=5%, Voltage Rating=50V, HelpURL=https://www.tme.eu/Document/d2a72e545e5c8eb7bf2a04fa97535928/rc0603yageo.pdf, Mounting Technology=SMT, Revision Num.=1
R6 R7 R8 R9 R10 R11 R12 R13 R14 R15 R16 R17 R18 R19 R20 R21 R22 R23 R24 R25 R27 R28: library part CMP-009-00054-14, Case/Package=0603, POWER=100mW, RESISTANCE=2.2k, Tolerance=5%, Voltage Rating=50V, HelpURL=https://www.mouser.pl/datasheet/2/315/AOA0000C334-1314047.pdf, Mounting Technology=SMT, Revision Num.=1
R54 R55: library part CMP-009-00017-19, Case/Package=0603, POWER=100mW, RESISTANCE=5.1k, Tolerance=1%, Voltage Rating=50V, HelpURL=https://www.mouser.pl/datasheet/2/54/cr-1858361.pdf, Mounting Technology=SMT, Revision Num.=1
UP1: library part CMP-020-00035-2, "MCU Arm Cortex-M33 32-bit 250MHz, 128 Kbytes of Flash, 32 Kbytes of RAM, I3C", Case/Package=UFQFPN32, Clock Frequency=250MHz, Man. Part Num.=STM32H503CBU6, Max Supply Voltage=3.6V, Min Supply Voltage=1.71V, HelpURL=https://www.st.com/resource/en/datasheet/stm32h503eb.pdf, Mounting Technology=SMT, Pins=48, RAM Size=32kB, Revision Num.=1, ROM Size=128kB, Series=STM32H503xx
X1: library part X_16MHz_LFSPXO066657CUTT-10, "Quartz generator; 16MHz; 50ppm; SMT", Case/Package="2.5mm x 2.1mm", Frequency=16MHz, Man. Part Num.=LFSPXO066657CUTT, Rated Supply Voltage=3.3V, Tolerance=50ppm, HelpURL=https://www.tme.eu/Document/f2507c161887e0dea281275093e92f79/LFSPXO066657CUTT.pdf, Mounting Technology=SMT, Revision Num.=1

## Via types
v1: diameter 0.6, hole 0.3, Top Layer to Bottom Layer, tented both sides, 1189 vias
v2: diameter 0.45, hole 0.2, Top Layer to Bottom Layer, tented both sides, 35 vias
v3: diameter 0.6, hole 0.4, Top Layer to Bottom Layer, tented both sides, 7 vias

## Nets (pads, with @x,y where several pads share a name; then routed paths per layer and width w, separated by ;. In a path a pad name is that pad's centre, name@x,y a point inside that pad or via, vN(x,y) a via of type N, cw(c..) or ccw(c..) an arc to the next point about the centre after c; other vN are vias at no path point)
+3V3: C1.1 C2.1 C3.1 C4.1 C5.1 C6.1 C7.1 C11.1 C12.1 C13.1 C14.1 C15.1 C16.1 C17.1 C18.1 C19.1 C20.1 C21.1 C22.1 C24.1 IC1.24 IC2.1 IC2.14 IC4.1 IC4.2 J1.1 J2.4 J3.1 J4.4 J5.1 J6.4 J7.1 J8.4 J9.1 J10.4 J12.3 R4.2 R6.1 R7.1 R8.1 R9.1 R10.1 R11.1 R12.1 R13.1 R14.1 R15.1 R16.1 R17.1 R18.1 R19.1 R20.1 R21.1 R22.1 R23.1 R24.1 R25.1 R26.1 R27.1 R28.1 R29.1 R30.1 R31.1 R53.2 UP1.1 UP1.9 UP1.24 UP1.36 UP1.48 X1.1 X1.4 | length 92.4
  Top Layer w0.305: J3.1@5.8,42.875 J3.1@5.9,42.775 6.3,42.775 7.153,43.627 7.153,43.853 C21.1@7.288,43.988 ; J9.1@5.9,6.475 6.3,6.475 7.053,7.228 7.053,7.452 7.2,7.6 C18.1@7.3,7.6 ; J7.1@5.9,18.575 6.3,18.575 7.053,19.328 7.053,19.653 C19.1@7.3,19.9 ; J5.1@5.9,30.675 6.3,30.675 7.053,31.428 7.053,31.653 C20.1@7.2,31.8 ; J1.1@5.9,54.875 6.148,55.123 6.623,55.123 7.053,55.553 7.053,55.778 7.275,56 C22.1@7.3,56 ; C18.1@7.3,7.675 8.025,7.675 v1(8.4,7.3) ; C19.1@7.3,19.775 8.025,19.775 v1(8.4,19.4) ; C20.1@7.3,31.875 7.334,31.841 7.979,31.841 8.32,31.5 v1(8.4,31.5) ; C21.1@7.3,43.975 8.025,43.975 v1(8.4,43.6) ; C22.1@7.3,56.075 8.025,56.075 v1(8.4,55.7) ; R15.1@13.4,4.775 13.437,4.737 14.563,4.737 v1@14.6,4.7 ; R10.1@13.4,12.15 13.425,12.175 14.375,12.175 v1(14.4,12.2) ; C24.1@14,56.8 C24.1@14.025,56.775 ; IC4.2@15.5,56.198 15.572,56.125 IC4.2@16,56.125 ; R13.1@16.3,24 16.444,24.144 16.444,24.944 v1(16.5,25) 16.5,25.05 17.225,25.775 R8.1@17.225,25.8 ; X1.1@16.35,17.025 16.475,16.9 C7.1@16.475,15.5 16.437,15.462 16.437,14.537 v1(16.4,14.5) ; X1.4@16.35,18.375 16.35,17.35 X1.1@16.4,17.3 ; v1@17.562,12.838 18.663,12.838 R4.2@18.7,12.875 ; v1(18.4,23.2) 18.456,23.256 18.456,23.406 19.125,24.075 R9.1@19.125,24.1 ; v1@18.6,43.75 19.325,43.025 R12.1@19.325,43 ; v1(18.612,43.742) 18.619,43.748 18.619,44.519 R7.1@18.7,44.6 ; v1(18.9,15.5) 18.956,15.556 19.356,15.556 19.552,15.752 19.653,15.752 19.7,15.8 C6.1@19.7,15.9 ; v1(18.9,20.7) 18.913,20.713 19.987,20.713 C4.1@20,20.7 ; C6.1@20,16 20.05,16 20.45,16.4 UP1.9@21.6,16.4 ; R14.1@20.025,25.8 20.025,25.825 20.248,26.047 20.368,26.047 20.8,26.48 v1@20.8,26.5 ; C4.1@20.15,20.7 20.45,20.4 UP1.1@21.6,20.4 ; R6.1@21.465,44.602 21.465,44.535 v1(22.1,43.9) ; v1@21.6,21 21.7,21.1 21.7,22.375 21.753,22.427 21.753,22.452 21.975,22.675 C3.1@22,22.675 ; IC2.14@21.623,1.7 C12.1@23.2,1.7 ; IC2.14@21.65,1.362 21.65,1.627 IC2.14@21.723,1.7 ; IC2.1@21.65,7.238 21.675,7.263 21.675,8.475 v1(21.7,8.5) ; C3.1@22.1,22.575 22.1,21.554 22.281,21.372 22.297,21.372 22.297,21.103 UP1.48@22.3,21.1 ; R11.1@22.125,43 22.2,43.075 v1@22.2,43.8 ; IC1.24@22.925,31.549 C11.1@24.516,31.549 ; C12.1@23.387,1.712 23.387,2.687 v1(23.4,2.7) ; v1@23.7,9.3 23.729,9.271 24.755,9.271 R28.1@24.785,9.241 ; v1(24.5,10.4) R31.1@24.5,11.25 ; C11.1@24.5,31.525 v1(24.5,32.4) ; UP1.24@27.8,14.2 27.8,13.93 27.802,13.927 28.072,13.927 28.3,13.7 C5.1@28.3,13 ; C5.1@28.3,12.725 C5.1@28.4,12.725 29.325,12.725 C1.1@29.4,12.8 ; UP1.36@28.5,20.4 28.77,20.4 29.673,21.303 29.852,21.303 C2.1@30,21.45 ; C1.1@29.7,12.725 v1(29.7,13.7) ; C2.1@30,21.6 30.1,21.7 v1(30.1,22.7) ; v1(30,41.2) R53.2@30,42.175
  Top Layer w0.4: C24.1@14.025,56.775 IC4.1@16,56.775 ; IC4.2@15.5,56.198 IC4.1@15.5,56.8
  Bottom Layer w0.2: R24.1@19.202,25.175 R24.1@19.202,25.2 ; v1@20.823,26.423 v1(20.9,26.5)
  Bottom Layer w0.305: J10.4@5.9,5.775 6.3,5.775 7.052,6.527 7.052,6.752 7.1,6.8 C13.1@7.3,6.8 ; J8.4@5.9,17.875 6.3,17.875 7.052,18.627 7.052,18.852 C15.1@7.2,19 ; J6.4@5.9,29.975 6.3,29.975 7.052,30.727 7.052,30.952 7.275,31.175 7.995,31.175 8.32,31.5 v1(8.4,31.5) ; J4.4@5.9,42.075 6.3,42.075 6.548,42.323 6.548,42.523 7.052,43.027 7.052,43.052 7.275,43.275 C16.1@7.3,43.275 8.075,43.275 v1(8.4,43.6) ; J2.4@5.9,54.175 6.3,54.175 7.1,54.975 C17.1@7.1,55.1 ; C13.1@7.3,6.975 8.085,6.975 8.31,7.2 v1@8.4,7.2 ; C15.1@7.3,19.075 7.995,19.075 8.3,19.38 v1@8.3,19.4 ; C17.1@7.3,55.375 8.075,55.375 v1@8.3,55.6 ; v1(13.1,29.9) 13.1,29 R18.1@13.2,28.9 ; v1(13.1,38.5) R22.1@13.1,39.475 ; R17.1@13.1,43.8 v1(13.1,44.8) ; R23.1@13.2,24.375 13.225,24.375 13.447,24.152 13.447,23.732 13.8,23.38 v1@13.8,23.2 ; R25.1@13.4,1.025 14.425,1.025 v1@14.6,1.2 ; v1@14.4,43.5 14.456,43.556 15.152,43.556 15.375,43.779 R16.1@15.375,43.8 ; v1@17.544,12.856 18.14,13.453 18.427,13.453 18.65,13.675 R27.1@18.65,13.7 ; R30.1@17.9,5.45 17.994,5.544 18.764,5.544 18.8,5.58 v1@18.8,5.6 ; v1(18.5,3) 18.55,3.05 19.45,3.05 R29.1@19.5,3 ; R24.1@19.202,25.2 20.425,26.423 v1@20.823,26.423 ; R21.1@20.925,43.8 21.92,43.8 22,43.88 v1@22,43.9 ; R26.1@23.925,35 24.8,35 v1@24.9,35.1 ; R19.1@24.25,25.2 v1(25.2,25.2) ; R20.1@24.725,0.4 v1(25.8,0.4)
  other v1: 14.5,1.1 14.5,4.7 18.9,5.6 23.8,9.3 17.5,12.8 21.7,21 13.8,23.3 24.9,35 14.5,43.5
  other v3: 13.1,58.2 13.9,58.2
+V_SAFE: C23.1 FB1.2 IC4.5 IC4.8 | length 7.5
  Top Layer w0.305: IC4.8@20.6,56.7 C23.1@22.8,56.7 22.353,56.253 21.933,56.253 21.5,55.82 21.5,55.044 21.321,54.866 20.916,54.866 IC4.5@20.9,54.85
  Top Layer w1: C23.1@22.7,56.7 FB1.2@24.9,56.7
+VBUS: F1.1 IC3.5 J11.A4-B9 J11.B4-A9 R52.2 | length 5.3
  Top Layer w0.305: v1(32.8,16.5) IC3.5@32.8,17.6 ; v1(34,4.9) R52.2@34,5.875 ; J11.A4-B9@36.21,15.9 36.485,15.9 36.632,16.047 36.847,16.047 v1(37.5,16.7) ; J11.B4-A9@36.21,20.7 36.357,20.553 36.848,20.553 v1(37.5,19.9)
  other v1: 32.3,52.3 33.5,52.3